# Altium PCB PCB2.PcbDoc (part 2 of 3)
Units mm, origin at the board's own origin, x right, y up, seen from the top; angles counter-clockwise.
Board outline 30 x 45 mm, 4 copper layers (L1 (SIG), L2 (GND), L3 (GND), L4 (SIG+PWR)), stack 0.602 mm thick; 68 components, 50 nets, 259 pads, 113 vias.
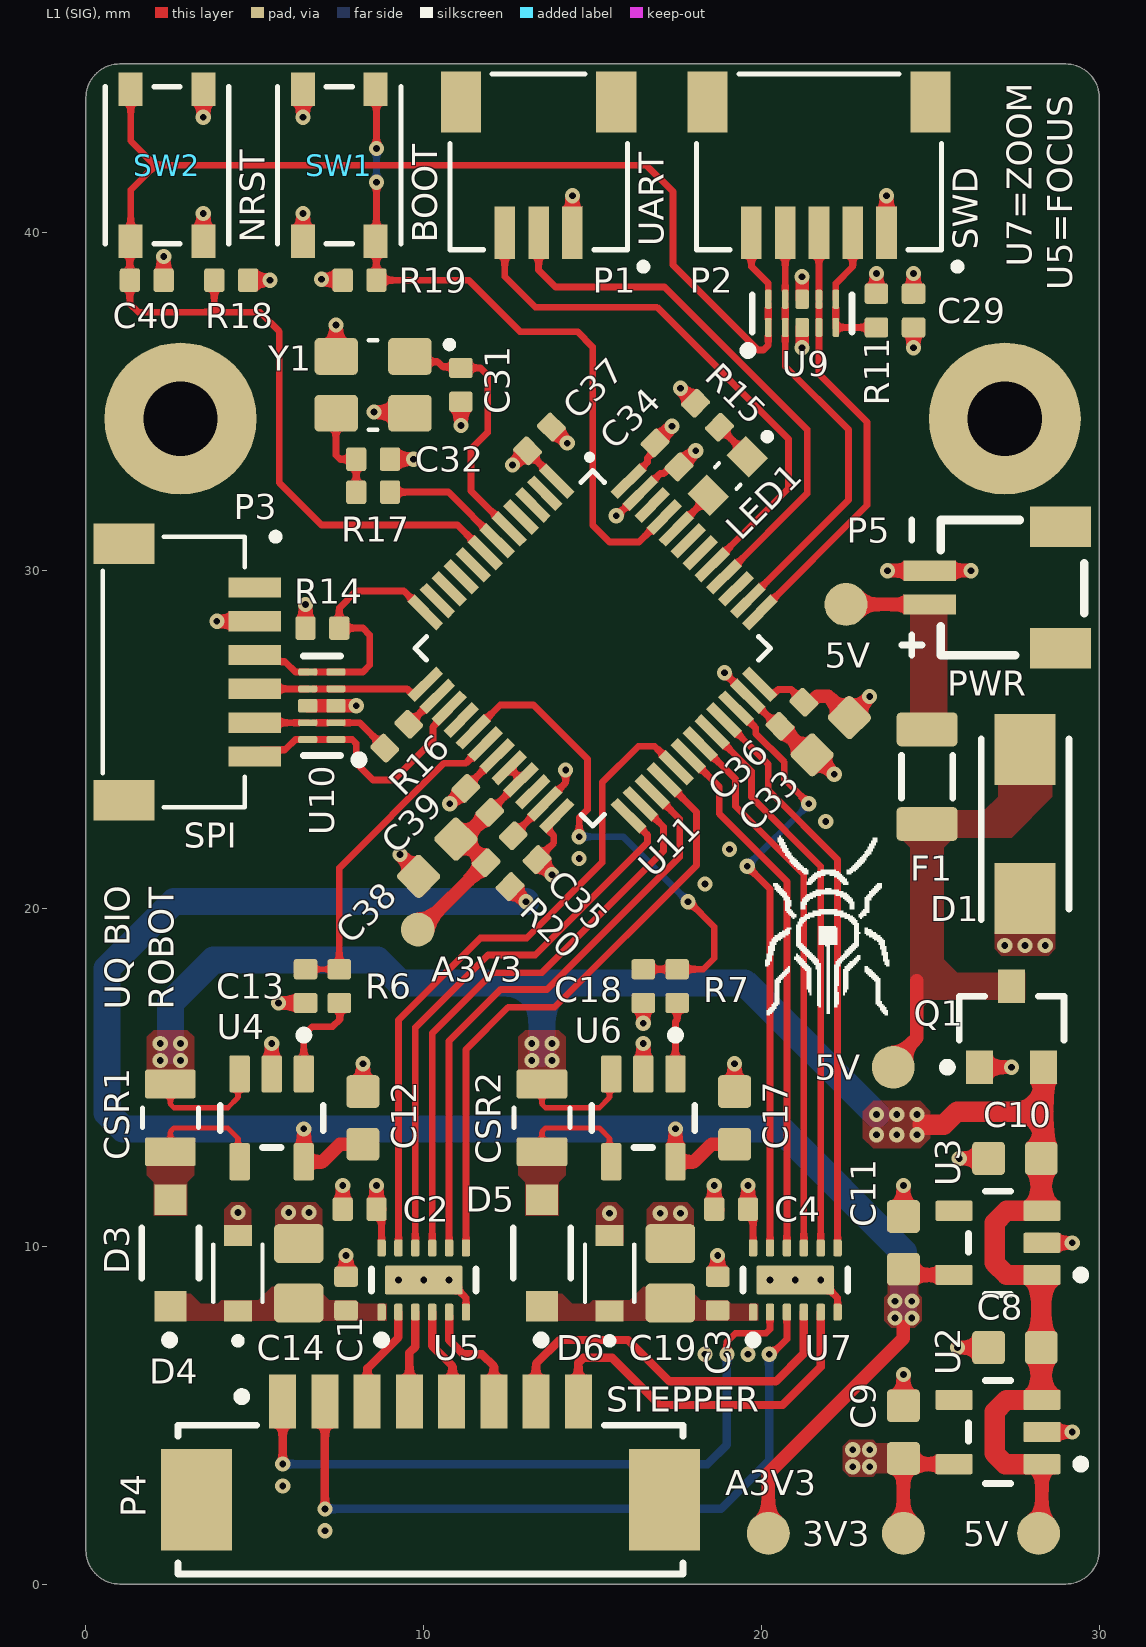
[diagram p0: L1 (SIG) view]

## Part data (continued)
D3 D5: "1N5819HW Series 40 V 1 A Surface Mount Schottky Barrier Rectifier - SOD-123", Average Rectified Current=1A, Capacitance=50pF, Case/Package=SOD-123-2, Forward Voltage=750mV, Manufacturer="Diodes Inc.", Max Forward Surge Current (Ifsm)=25A, Max Junction Temperature (Tj)=125°C, Max Power Dissipation=450mW, Max Repetitive Reverse Voltage (Vrrm)=40V, Min Operating Temperature=-65°C, Peak Reverse Current=1mA, Supplier Part Number 1=1N5819HW-FDICT-ND, Category="Schottky Diodes", China RoHS=Compliant, ComponentLink1Description=https://datasheet.octopart.com:443/1N5819HW-7-F-Diodes-Inc.-datasheet-180549196.pdf?src-supplier=IHS, ComponentLink1URL=https://datasheet.octopart.com:443/1N5819HW-7-F-Diodes-Inc.-datasheet-180549196.pdf?src-supplier=IHS, ComponentLink2Description=https://datasheet.octopart.com:443/1N5819HW-7-F-Diodes-Inc.-datasheet-8332965.pdf?src-supplier=Upverter, ComponentLink2URL=https://datasheet.octopart.com:443/1N5819HW-7-F-Diodes-Inc.-datasheet-8332965.pdf?src-supplier=Upverter, ComponentLink3Description=https://sigma.octopart.com:443/138895985/technical_drawing/Diodes-Inc.-1N5819HW-7-F.pdf?src-supplier=Upverter, ComponentLink3URL=https://sigma.octopart.com:443/138895985/technical_drawing/Diodes-Inc.-1N5819HW-7-F.pdf?src-supplier=Upverter, ComponentLink4Description=https://datasheet.octopart.com:443/1N5819HW-7-F-Diodes-Inc.-datasheet-134530231.pdf?src-supplier=Future+Electronics, ComponentLink4URL=https://datasheet.octopart.com:443/1N5819HW-7-F-Diodes-Inc.-datasheet-134530231.pdf?src-supplier=Future+Electronics, ComponentLink5Description=https://datasheet.octopart.com:443/1N5819HW-7-F-Diodes-Inc.-datasheet-34441420.pdf?src-supplier=Future+Electronics, ComponentLink5URL=https://datasheet.octopart.com:443/1N5819HW-7-F-Diodes-Inc.-datasheet-34441420.pdf?src-supplier=Future+Electronics, ComponentLink6Description=https://datasheet.octopart.com:443/1N5819HW-7-F-Diodes-Inc.-datasheet-10497210.pdf?src-supplier=Future+Electronics, ComponentLink6URL=https://datasheet.octopart.com:443/1N5819HW-7-F-Diodes-Inc.-datasheet-10497210.pdf?src-supplier=Future+Electronics, ComponentLink7Description=https://datasheet.octopart.com:443/1N5819HW-7-F-Diodes-Inc.-datasheet-169364014.pdf?src-supplier=Newark, ComponentLink7URL=https://datasheet.octopart.com:443/1N5819HW-7-F-Diodes-Inc.-datasheet-169364014.pdf?src-supplier=Newark, ComponentLink8Description=https://datasheet.octopart.com:443/1N5819HW-7-F-Diodes-Inc.-datasheet-78715396.pdf?src-supplier=Newark, ComponentLink8URL=https://datasheet.octopart.com:443/1N5819HW-7-F-Diodes-Inc.-datasheet-78715396.pdf?src-supplier=Newark, ComponentLink9Description=https://datasheet.octopart.com:443/1N5819HW-7-F-Diodes-Inc.-datasheet-14053419.pdf?src-supplier=iiiC, ComponentLink9URL=https://datasheet.octopart.com:443/1N5819HW-7-F-Diodes-Inc.-datasheet-14053419.pdf?src-supplier=iiiC, ComponentLink10Description=https://datasheet.octopart.com:443/1N5819HW-7-F-Diodes-Inc.-datasheet-7274306.pdf?src-supplier=Jameco+(USA), ComponentLink10URL=https://datasheet.octopart.com:443/1N5819HW-7-F-Diodes-Inc.-datasheet-7274306.pdf?src-supplier=Jameco+(USA), ComponentLink11Description=https://datasheet.octopart.com:443/1N5819HW-7-F-Diodes-Inc.-datasheet-16627.pdf?src-supplier=Mouser, ComponentLink11URL=https://datasheet.octopart.com:443/1N5819HW-7-F-Diodes-Inc.-datasheet-16627.pdf?src-supplier=Mouser, ComponentLink12Description=https://datasheet.octopart.com:443/1N5819HW-7-F-Diodes-Inc.-datasheet-145195.pdf?src-supplier=DigiKey, ComponentLink12URL=https://datasheet.octopart.com:443/1N5819HW-7-F-Diodes-Inc.-datasheet-145195.pdf?src-supplier=DigiKey, ComponentLink13Description=http://sigma.octopart.com:80/15616867/materials_sheet/Diodes-Inc.-1N5819HW-7-F.pdf?src-supplier=Compliance+Statements, ComponentLink13URL=http://sigma.octopart.com:80/15616867/materials_sheet/Diodes-Inc.-1N5819HW-7-F.pdf?src-supplier=Compliance+Statements, Contact Plating=Tin, Current Rating=1A, Element Configuration=Single, Forward Current=1A, Height=1.45mm, Lead Free="Lead Free", Length=2.85mm, Lifecycle Status=Production, Manufacturer Part Number=1N5819HW-7-F, Max Operating Temperature=125°C, Max Output Current=1A, Max Reverse Voltage (DC)=40V, Min Breakdown Voltage=40V, Number of Elements=1, Number of Pins=2, Number of Terminals=2, Output Current=1A, Packaging="Tape and Reel", Peak Non-Repetitive Surge Current=25A, Polarity=Standard, Pricing 1="1=0.29, 10=0.178, 100=0.1108, 500=0.08152, 1000=0.07202 (USD)", Radiation Hardening=No, REACH SVHC=Yes, Reverse Standoff Voltage=40V, Reverse Voltage=40V, RoHS=Compliant, Schedule B="8541100080, 8541100080|8541100080|8541100080|8541100080|8541100080", Stock 1=1016143, Supplier 1=DigiKey, Termination=SMD/SMT, Voltage Rating (DC)=40V, Weight=10.007382mg, Width=1.7mm
D4 D6: "Trans Voltage Suppressor Diode, 350W, 5V V(RWM), Unidirectional, 1 Element, Silicon", Clamping Voltage=14.5V, Manufacturer="Sangdest Microelectronics", Max Operating Temperature=125°C, Min Breakdown Voltage=6V, Min Operating Temperature=-55°C, Peak Pulse Power=350W, Peak Reverse Current=10µA, Reverse Standoff Voltage=5V, Supplier Part Number 1=1655-SD05CT-ND, Category="TVS Diodes", ComponentLink1Description=https://datasheet.octopart.com:443/SD05-SMC-Diode-Solutions-datasheet-181400473.pdf?src-supplier=IHS, ComponentLink1URL=https://datasheet.octopart.com:443/SD05-SMC-Diode-Solutions-datasheet-181400473.pdf?src-supplier=IHS, Lifecycle Status=Production, Manufacturer Part Number=SD05, Number of Elements=1, Number of Terminals=2, Polarity=Unidirectional, Pricing 1="1=0.27, 10=0.165, 100=0.1025, 500=0.0752, 1000=0.06636 (USD)", REACH SVHC=Yes, RoHS=Compliant, Stock 1=13210, Supplier 1=DigiKey
F1: library part 1206L075THYR, "PTC Resettable Fuse 0.75A(hold) 1.5A(trip) 8VDC 100A 0.6W 0.2s 0.09Ohm SMD Solder Pad 1206 T/R", Case Code (Imperial)=1206, Case Code (Metric)=3216, Current Rating=100A, Hold Current=750mA, Manufacturer=Littelfuse, Max Operating Temperature=85°C, Max Supply Voltage (DC)=8V, Maximum Resistance 1 Hour (R1max)=290mΩ, Min Operating Temperature=-40°C, Minimum Resistance Initial (Rmin)=90mΩ, Power Dissipation=600mW, Ratings=TUV, Supplier Part Number 1=F3370CT-ND, Trip Current=1.5A, Approvals="TUV, cULus", Case/Package=1206, Category="PTC Resettable Fuses", China RoHS=Compliant, ComponentLink1Description=https://datasheet.octopart.com:443/1206L075THYR-Littelfuse-datasheet-181956355.pdf?src-supplier=Farnell, ComponentLink1URL=https://datasheet.octopart.com:443/1206L075THYR-Littelfuse-datasheet-181956355.pdf?src-supplier=Farnell, ComponentLink2Description=https://datasheet.octopart.com:443/1206L075THYR-Littelfuse-datasheet-8722135.pdf?src-supplier=Farnell, ComponentLink2URL=https://datasheet.octopart.com:443/1206L075THYR-Littelfuse-datasheet-8722135.pdf?src-supplier=Farnell, ComponentLink3Description=https://datasheet.octopart.com:443/1206L075THYR-Littelfuse-datasheet-12510028.pdf?src-supplier=Farnell, ComponentLink3URL=https://datasheet.octopart.com:443/1206L075THYR-Littelfuse-datasheet-12510028.pdf?src-supplier=Farnell, ComponentLink4Description=https://datasheet.octopart.com:443/1206L075THYR-Littelfuse-datasheet-10365336.pdf?src-supplier=Farnell, ComponentLink4URL=https://datasheet.octopart.com:443/1206L075THYR-Littelfuse-datasheet-10365336.pdf?src-supplier=Farnell, ComponentLink5Description=https://datasheet.octopart.com:443/1206L075THYR-Littelfuse-datasheet-8701791.pdf?src-supplier=Farnell, ComponentLink5URL=https://datasheet.octopart.com:443/1206L075THYR-Littelfuse-datasheet-8701791.pdf?src-supplier=Farnell, ComponentLink6Description=https://datasheet.octopart.com:443/1206L075THYR-Littelfuse-datasheet-8325659.pdf?src-supplier=Farnell, ComponentLink6URL=https://datasheet.octopart.com:443/1206L075THYR-Littelfuse-datasheet-8325659.pdf?src-supplier=Farnell, ComponentLink7Description=https://datasheet.octopart.com:443/1206L075THYR-Littelfuse-datasheet-8821216.pdf?src-supplier=element14+APAC, ComponentLink7URL=https://datasheet.octopart.com:443/1206L075THYR-Littelfuse-datasheet-8821216.pdf?src-supplier=element14+APAC, ComponentLink8Description=https://datasheet.octopart.com:443/1206L075THYR-Littelfuse-datasheet-165518606.pdf?src-supplier=Newark, ComponentLink8URL=https://datasheet.octopart.com:443/1206L075THYR-Littelfuse-datasheet-165518606.pdf?src-supplier=Newark, ComponentLink9Description=https://datasheet.octopart.com:443/1206L075THYR-Littelfuse-datasheet-8814422.pdf?src-supplier=Newark, ComponentLink9URL=https://datasheet.octopart.com:443/1206L075THYR-Littelfuse-datasheet-8814422.pdf?src-supplier=Newark, ComponentLink10Description=https://datasheet.octopart.com:443/1206L075THYR-Littelfuse-datasheet-130008768.pdf?src-supplier=ODG+(Origin+Data+Global), ComponentLink10URL=https://datasheet.octopart.com:443/1206L075THYR-Littelfuse-datasheet-130008768.pdf?src-supplier=ODG+(Origin+Data+Global), ComponentLink11Description=https://datasheet.octopart.com:443/1206L075THYR-Littelfuse-datasheet-26530142.pdf?src-supplier=Fuses+Unlimited, ComponentLink11URL=https://datasheet.octopart.com:443/1206L075THYR-Littelfuse-datasheet-26530142.pdf?src-supplier=Fuses+Unlimited, ComponentLink12Description=https://datasheet.octopart.com:443/1206L075THYR-Littelfuse-datasheet-183575726.pdf?src-supplier=Sager+Electronics, ComponentLink12URL=https://datasheet.octopart.com:443/1206L075THYR-Littelfuse-datasheet-183575726.pdf?src-supplier=Sager+Electronics, ComponentLink13Description=https://datasheet.octopart.com:443/1206L075THYR-Littelfuse-datasheet-176144932.pdf?src-supplier=Sager+Electronics, ComponentLink13URL=https://datasheet.octopart.com:443/1206L075THYR-Littelfuse-datasheet-176144932.pdf?src-supplier=Sager+Electronics, ComponentLink14Description=https://datasheet.octopart.com:443/1206L075THYR-Littelfuse-datasheet-170674161.pdf?src-supplier=Future+Electronics, ComponentLink14URL=https://datasheet.octopart.com:443/1206L075THYR-Littelfuse-datasheet-170674161.pdf?src-supplier=Future+Electronics, ComponentLink15Description=https://datasheet.octopart.com:443/1206L075THYR-Littelfuse-datasheet-20852186.pdf?src-supplier=Future+Electronics, ComponentLink15URL=https://datasheet.octopart.com:443/1206L075THYR-Littelfuse-datasheet-20852186.pdf?src-supplier=Future+Electronics, ComponentLink16Description=https://datasheet.octopart.com:443/1206L075THYR-Littelfuse-datasheet-177174148.pdf?src-supplier=Burklin+Elektronik, ComponentLink16URL=https://datasheet.octopart.com:443/1206L075THYR-Littelfuse-datasheet-177174148.pdf?src-supplier=Burklin+Elektronik, Export Control Classification Number (ECCN) Code=EAR99, Harmonized Tariff Schedule (HTS) Code=8533.40.80.70, Height=750µm, Introduction Date=2009-08-04, Lead Free="Lead Free", Length=3.4mm, Lifecycle Status=Production, Manufacturer Part Number=1206L075THYR, Max Current Rating=100A, Max Voltage Rating (DC)=8V, Mount="Surface Mount", Number of Terminals=2, Operating Supply Voltage=8V, Packaging="Cut Tape", Pricing 1="1=0.64, 5=0.528, 10=0.488, 50=0.4048, 100=0.3734, 250=0.33572, 500=0.30966, 1000=0.28553 (USD)", REACH SVHC=Yes, Resistance=90mΩ, RoHS=Compliant, Stock 1=23337, Supplier 1=DigiKey, Termination=SMD/SMT, Time to Trip=200ms, Voltage Rating (DC)=8V, Width=1.8mm, Working Voltage=8V
LED1: library part LTST-C190KGKT, "LED yellow green 0603 wavelength 567.5nm~576.5nm light intensity 18mcd~71mcd Front Mounting", Case Code (Imperial)=0603, Case Code (Metric)=1608, Color=Green, Forward Current=30mA, Forward Voltage=2.15V, Lens Color="Clear, Colorless", Manufacturer="Diodes Inc.", Max Operating Temperature=85°C, Min Operating Temperature=-30°C, Power Dissipation=75mW, Reverse Voltage=5V, Test Current=20mA, Case/Package=0603, Category=LEDs, China RoHS=Compliant, ComponentLink1Description=https://datasheet.octopart.com:443/LTST-C190KGKT-Lite-On-datasheet-86397316.pdf?src-supplier=ODG+(Origin+Data+Global), ComponentLink1URL=https://datasheet.octopart.com:443/LTST-C190KGKT-Lite-On-datasheet-86397316.pdf?src-supplier=ODG+(Origin+Data+Global), ComponentLink2Description=https://datasheet.octopart.com:443/LTST-C190KGKT-Lite-On-datasheet-180605179.pdf?src-supplier=IHS, ComponentLink2URL=https://datasheet.octopart.com:443/LTST-C190KGKT-Lite-On-datasheet-180605179.pdf?src-supplier=IHS, ComponentLink3Description=https://datasheet.octopart.com:443/LTST-C190KGKT-Lite-On-datasheet-13693967.pdf?src-supplier=Factory+Futures, ComponentLink3URL=https://datasheet.octopart.com:443/LTST-C190KGKT-Lite-On-datasheet-13693967.pdf?src-supplier=Factory+Futures, ComponentLink4Description=https://datasheet.octopart.com:443/LTST-C190KGKT-Lite-On-datasheet-165573809.pdf?src-supplier=TME, ComponentLink4URL=https://datasheet.octopart.com:443/LTST-C190KGKT-Lite-On-datasheet-165573809.pdf?src-supplier=TME, ComponentLink5Description=https://datasheet.octopart.com:443/LTST-C190KGKT-Lite-On-datasheet-165573808.pdf?src-supplier=TME, ComponentLink5URL=https://datasheet.octopart.com:443/LTST-C190KGKT-Lite-On-datasheet-165573808.pdf?src-supplier=TME, ComponentLink6Description=https://datasheet.octopart.com:443/LTST-C190KGKT-Lite-On-datasheet-43775815.pdf?src-supplier=TME, ComponentLink6URL=https://datasheet.octopart.com:443/LTST-C190KGKT-Lite-On-datasheet-43775815.pdf?src-supplier=TME, ComponentLink7Description=https://datasheet.octopart.com:443/LTST-C190KGKT-Lite-On-datasheet-32046999.pdf?src-supplier=Future+Electronics, ComponentLink7URL=https://datasheet.octopart.com:443/LTST-C190KGKT-Lite-On-datasheet-32046999.pdf?src-supplier=Future+Electronics, ComponentLink8Description=https://datasheet.octopart.com:443/LTST-C190KGKT-Lite-On-datasheet-8326678.pdf?src-supplier=Future+Electronics, ComponentLink8URL=https://datasheet.octopart.com:443/LTST-C190KGKT-Lite-On-datasheet-8326678.pdf?src-supplier=Future+Electronics, ComponentLink9Description=https://datasheet.octopart.com:443/LTST-C190KGKT-Lite-On-datasheet-78838574.pdf?src-supplier=Future+Electronics, ComponentLink9URL=https://datasheet.octopart.com:443/LTST-C190KGKT-Lite-On-datasheet-78838574.pdf?src-supplier=Future+Electronics, ComponentLink10Description=https://datasheet.octopart.com:443/LTST-C190KGKT-Lite-On-datasheet-158288.pdf?src-supplier=Mouser, ComponentLink10URL=https://datasheet.octopart.com:443/LTST-C190KGKT-Lite-On-datasheet-158288.pdf?src-supplier=Mouser, ComponentLink11Description=https://datasheet.octopart.com:443/LTST-C190KGKT-Lite-On-datasheet-49281.pdf?src-supplier=DigiKey, ComponentLink11URL=https://datasheet.octopart.com:443/LTST-C190KGKT-Lite-On-datasheet-49281.pdf?src-supplier=DigiKey, ComponentLink12Description=https://datasheet.octopart.com:443/LTST-C190KGKT-Lite-On-datasheet-14174998.pdf?src-supplier=iiiC, ComponentLink12URL=https://datasheet.octopart.com:443/LTST-C190KGKT-Lite-On-datasheet-14174998.pdf?src-supplier=iiiC, Depth=800µm, Dominant Wavelength=571nm, Height=800µm, Illumination Color=Green, Lead Free="Lead Free", Length=1.6mm, Lens Style=Clear, Lens Transparency=Clear, Lifecycle Status=Production, Luminous Intensity=35mcd, Manufacturer Part Number=LTST-C190KGKT, Mount="Surface Mount", Number of Circuits=1, Number of Elements=1, Number of LEDs=1, Number of Pins=2, Number of Terminals=2, Peak Wavelength=574nm, Power Rating=75mW, Pricing 1="1=0.13, 10=0.088, 100=0.0603, 500=0.04758, 1000=0.04332, 2000=0.03968 (USD)", Radiation Hardening=No, REACH SVHC=Yes, RoHS=Compliant, Schedule B="8541402000, 8541402000|8541402000|8541402000|8541402000|8541402000|8541402000|8541402000|8541402000|8541402000|8541402000|8541402000|8541402000|8541402000|8541402000|8541402000|8541402000|8541402000|8541402000|8541402000|8541402000|8541402000|8541402000|8541402000|85", Shape=Rectangular, Stock 1=2033232, Supplier 1=DigiKey, Terminal Pitch=1.5mm, Viewing Angle=130°, Wavelength=574nm, Width=800µm
P1: library part SM03B-SRSS-TB_UART, "Board Connector, 3 Contact(s), 1 Row(s), Male, Right Angle, Surface Mount Terminal", Color=Natural, Manufacturer=JST, Max Operating Temperature=85°C, Min Operating Temperature=-25°C, Category="Card Edge Connectors", ComponentLink1Description=https://datasheet.octopart.com:443/SM03B-SRSS-TB-JST-datasheet-180492086.pdf?src-supplier=IHS, ComponentLink1URL=https://datasheet.octopart.com:443/SM03B-SRSS-TB-JST-datasheet-180492086.pdf?src-supplier=IHS, ComponentLink2Description=https://datasheet.octopart.com:443/SM03B-SRSS-TB-JST-datasheet-44103209.pdf?src-supplier=TME, ComponentLink2URL=https://datasheet.octopart.com:443/SM03B-SRSS-TB-JST-datasheet-44103209.pdf?src-supplier=TME, ComponentLink3Description=https://datasheet.octopart.com:443/SM03B-SRSS-TB-JST-datasheet-118603.pdf?src-supplier=DigiKey, ComponentLink3URL=https://datasheet.octopart.com:443/SM03B-SRSS-TB-JST-datasheet-118603.pdf?src-supplier=DigiKey, ComponentLink4Description=https://datasheet.octopart.com:443/SM03B-SRSS-TB-JST-datasheet-152738602.pdf?src-supplier=Amar+Radio+Corporation, ComponentLink4URL=https://datasheet.octopart.com:443/SM03B-SRSS-TB-JST-datasheet-152738602.pdf?src-supplier=Amar+Radio+Corporation, Connector Type="Male Pin", Contact Gender=Male, Contact Plating=Tin, Housing Color=Natural, Housing Material=Nylon, Lead Free="Contains Lead", Lifecycle Status=Obsolete, Manufacturer Part Number=SM03B-SRSS-TB, Mount="Surface Mount", Number of Contacts=3, Number of Pins=3, Number of Positions=3, Number of Rows=1, Orientation=Horizontal, Pitch=990.6µm, Pricing 1="1=0.44, 10=0.373, 100=0.317, 500=0.2829, 1000=0.26938 (USD)", RoHS=Compliant, Stock 1=14167, Supplier 1=DigiKey, Terminal Pitch=1mm, Termination=Solder
P2: library part SM05B-SRSS-TB-SWD, "Board Connector, 5 Contact(s), 1 Row(s), Male, Right Angle, Surface Mount Terminal", Color=Natural, Manufacturer=JST, Category="Card Edge Connectors", ComponentLink1Description=https://datasheet.octopart.com:443/SM05B-SRSS-TB-JST-datasheet-180492086.pdf?src-supplier=IHS, ComponentLink1URL=https://datasheet.octopart.com:443/SM05B-SRSS-TB-JST-datasheet-180492086.pdf?src-supplier=IHS, ComponentLink2Description=https://datasheet.octopart.com:443/SM05B-SRSS-TB-JST-datasheet-118603.pdf?src-supplier=DigiKey, ComponentLink2URL=https://datasheet.octopart.com:443/SM05B-SRSS-TB-JST-datasheet-118603.pdf?src-supplier=DigiKey, ComponentLink3Description=https://datasheet.octopart.com:443/SM05B-SRSS-TB-JST-datasheet-152738602.pdf?src-supplier=Amar+Radio+Corporation, ComponentLink3URL=https://datasheet.octopart.com:443/SM05B-SRSS-TB-JST-datasheet-152738602.pdf?src-supplier=Amar+Radio+Corporation, Connector Type="Male Pin", Contact Plating=Tin, Export Control Classification Number (ECCN) Code=EAR99, Gender=Male, Harmonized Tariff Schedule (HTS) Code=8536.69.40.40, Housing Color=Natural, Housing Material=Nylon, Introduction Date=1996-04-01, Lead Free="Contains Lead", Lifecycle Status=Obsolete, Manufacturer Part Number=SM05B-SRSS-TB, Mount="Surface Mount", Number of Contacts=5, Number of Positions=5, Number of Rows=1, Orientation="Right Angle", Pitch=990.6µm, Pricing 1="1=0.62, 10=0.527, 100=0.4477, 500=0.3996, 1000=0.38051 (USD)", RoHS=Compliant, Stock 1=42194, Supplier 1=DigiKey, Terminal Pitch=1mm, Termination=Solder
P3: library part SM06B-SRSS-TB_SPI, "Board Connector, 6 Contact(s), 1 Row(s), Male, Right Angle, 0.039 inch Pitch, Surface Mount Terminal", Color=Natural, Dielectric Material=Polyamide, Manufacturer=JST, Max Operating Temperature=85°C, Min Operating Temperature=-25°C, Category="Card Edge Connectors", ComponentLink1Description=https://datasheet.octopart.com:443/SM06B-SRSS-TB-JST-datasheet-118603.pdf?src-supplier=Upverter, ComponentLink1URL=https://datasheet.octopart.com:443/SM06B-SRSS-TB-JST-datasheet-118603.pdf?src-supplier=Upverter, ComponentLink2Description=https://datasheet.octopart.com:443/SM06B-SRSS-TB-JST-datasheet-180492086.pdf?src-supplier=IHS, ComponentLink2URL=https://datasheet.octopart.com:443/SM06B-SRSS-TB-JST-datasheet-180492086.pdf?src-supplier=IHS, ComponentLink3Description=https://datasheet.octopart.com:443/SM06B-SRSS-TB-JST-datasheet-44103209.pdf?src-supplier=TME, ComponentLink3URL=https://datasheet.octopart.com:443/SM06B-SRSS-TB-JST-datasheet-44103209.pdf?src-supplier=TME, ComponentLink4Description=https://datasheet.octopart.com:443/SM06B-SRSS-TB-JST-datasheet-152738602.pdf?src-supplier=Amar+Radio+Corporation, ComponentLink4URL=https://datasheet.octopart.com:443/SM06B-SRSS-TB-JST-datasheet-152738602.pdf?src-supplier=Amar+Radio+Corporation, Connector Type="Male Pin", Contact Gender=Male, Contact Plating=Tin, Housing Color=Natural, Housing Material=Nylon, Lead Free="Contains Lead", Lifecycle Status=Obsolete, Manufacturer Package Identifier=SM06B-SRSS-TB, Manufacturer Part Number=SM06B-SRSS-TB, Mount="Surface Mount", Number of Contacts=6, Number of Pins=6, Number of Positions=6, Number of Rows=1, Orientation=Horizontal, Pitch=990.6µm, Pricing 1="1=0.67, 10=0.567, 100=0.4821, 500=0.43024, 1000=0.40969 (USD)", RoHS=Compliant, Stock 1=26532, Supplier 1=DigiKey, Terminal Pitch=1mm, Termination=Solder
P4: "1.25mm (.049\") Pitch PicoBlade Header, Surface Mount, Right Angle, Lead-free, 8 Circuits", Ambient Temperature Range High=105°C, Color=Beige, Contact Resistance=20mΩ, Current Rating=1A, Flammability Rating="UL94 V-0", Insulation Resistance=100MΩ, Manufacturer=Molex, Manufacturer Lifecycle Status=ACTIVE, Min Operating Temperature=-40°C, Ratings=CSA, Supplier Part Number 1=WM7626CT-ND, Voltage Rating=125V, Category="Headers and Wire Housings", China RoHS=Compliant, ComponentLink1Description=https://datasheet.octopart.com:443/53261-0871-Molex-datasheet-177725531.pdf?src-supplier=Farnell, ComponentLink1URL=https://datasheet.octopart.com:443/53261-0871-Molex-datasheet-177725531.pdf?src-supplier=Farnell, ComponentLink2Description=https://datasheet.octopart.com:443/53261-0871-Molex-datasheet-11023919.pdf?src-supplier=Farnell, ComponentLink2URL=https://datasheet.octopart.com:443/53261-0871-Molex-datasheet-11023919.pdf?src-supplier=Farnell, ComponentLink3Description=https://datasheet.octopart.com:443/53261-0871-Molex-datasheet-101583405.pdf?src-supplier=Farnell, ComponentLink3URL=https://datasheet.octopart.com:443/53261-0871-Molex-datasheet-101583405.pdf?src-supplier=Farnell, ComponentLink4Description=https://datasheet.octopart.com:443/532610871-Molex-datasheet-520094.pdf?src-supplier=Farnell, ComponentLink4URL=https://datasheet.octopart.com:443/532610871-Molex-datasheet-520094.pdf?src-supplier=Farnell, ComponentLink5Description=https://sigma.octopart.com:443/140425834/technical_drawing/Molex-53261-0871.pdf?src-supplier=Upverter, ComponentLink5URL=https://sigma.octopart.com:443/140425834/technical_drawing/Molex-53261-0871.pdf?src-supplier=Upverter, ComponentLink6Description=https://datasheet.octopart.com:443/53261-0871-Molex-datasheet-140462602.pdf?src-supplier=Upverter, ComponentLink6URL=https://datasheet.octopart.com:443/53261-0871-Molex-datasheet-140462602.pdf?src-supplier=Upverter, ComponentLink7Description=https://datasheet.octopart.com:443/53261-0871-Molex-datasheet-12537161.pdf?src-supplier=_legacy+Avnet, ComponentLink7URL=https://datasheet.octopart.com:443/53261-0871-Molex-datasheet-12537161.pdf?src-supplier=_legacy+Avnet, ComponentLink8Description=https://datasheet.octopart.com:443/532610871-Molex-datasheet-8343080.pdf?src-supplier=TME, ComponentLink8URL=https://datasheet.octopart.com:443/532610871-Molex-datasheet-8343080.pdf?src-supplier=TME, ComponentLink9Description=https://datasheet.octopart.com:443/53261-0871-Molex-datasheet-10404416.pdf?src-supplier=Molex, ComponentLink9URL=https://datasheet.octopart.com:443/53261-0871-Molex-datasheet-10404416.pdf?src-supplier=Molex, ComponentLink10Description=https://sigma.octopart.com:443/16413766/technical_drawing/Molex-53261-0871.pdf?src-supplier=Molex, ComponentLink10URL=https://sigma.octopart.com:443/16413766/technical_drawing/Molex-53261-0871.pdf?src-supplier=Molex, ComponentLink11Description=https://datasheet.octopart.com:443/53261-0871-Molex-datasheet-154756037.pdf?src-supplier=Master+Electronics, ComponentLink11URL=https://datasheet.octopart.com:443/53261-0871-Molex-datasheet-154756037.pdf?src-supplier=Master+Electronics, ComponentLink12Description=https://datasheet.octopart.com:443/53261-0871-Molex-datasheet-21208676.pdf?src-supplier=Electro+Sonic, ComponentLink12URL=https://datasheet.octopart.com:443/53261-0871-Molex-datasheet-21208676.pdf?src-supplier=Electro+Sonic, ComponentLink13Description=https://datasheet.octopart.com:443/53261-0871-Molex-datasheet-62105452.pdf?src-supplier=Electro+Sonic, ComponentLink13URL=https://datasheet.octopart.com:443/53261-0871-Molex-datasheet-62105452.pdf?src-supplier=Electro+Sonic, ComponentLink14Description=https://datasheet.octopart.com:443/53261-0871-Molex-datasheet-8522546.pdf?src-supplier=element14, ComponentLink14URL=https://datasheet.octopart.com:443/53261-0871-Molex-datasheet-8522546.pdf?src-supplier=element14, ComponentLink15Description=https://datasheet.octopart.com:443/53261-0871-Molex-datasheet-100429.pdf?src-supplier=element14, ComponentLink15URL=https://datasheet.octopart.com:443/53261-0871-Molex-datasheet-100429.pdf?src-supplier=element14, ComponentLink16Description=https://datasheet.octopart.com:443/0532610871-Molex-datasheet-157440116.pdf?src-supplier=Sager+Electronics, ComponentLink16URL=https://datasheet.octopart.com:443/0532610871-Molex-datasheet-157440116.pdf?src-supplier=Sager+Electronics, ComponentLink17Description=https://datasheet.octopart.com:443/53261-0871-Molex-datasheet-140186590.pdf?src-supplier=RS+(Formerly+Allied+Electronics), ComponentLink17URL=https://datasheet.octopart.com:443/53261-0871-Molex-datasheet-140186590.pdf?src-supplier=RS+(Formerly+Allied+Electronics), ComponentLink18Description=https://datasheet.octopart.com:443/53261-0871-Molex-datasheet-120153903.pdf?src-supplier=RS+(Formerly+Allied+Electronics), ComponentLink18URL=https://datasheet.octopart.com:443/53261-0871-Molex-datasheet-120153903.pdf?src-supplier=RS+(Formerly+Allied+Electronics), ComponentLink19Description=https://datasheet.octopart.com:443/53261-0871-Molex-datasheet-34442330.pdf?src-supplier=RS+(Formerly+Allied+Electronics), ComponentLink19URL=https://datasheet.octopart.com:443/53261-0871-Molex-datasheet-34442330.pdf?src-supplier=RS+(Formerly+Allied+Electronics), ComponentLink20Description=https://datasheet.octopart.com:443/532610871-Molex-datasheet-137316104.pdf?src-supplier=Future+Electronics, ComponentLink20URL=https://datasheet.octopart.com:443/532610871-Molex-datasheet-137316104.pdf?src-supplier=Future+Electronics, ComponentLink21Description=https://datasheet.octopart.com:443/53261-0871-Molex-datasheet-33003884.pdf?src-supplier=Newark, ComponentLink21URL=https://datasheet.octopart.com:443/53261-0871-Molex-datasheet-33003884.pdf?src-supplier=Newark, ComponentLink22Description=https://datasheet.octopart.com:443/53261-0871-Molex-datasheet-33003883.pdf?src-supplier=Newark, ComponentLink22URL=https://datasheet.octopart.com:443/53261-0871-Molex-datasheet-33003883.pdf?src-supplier=Newark, ComponentLink23Description=https://datasheet.octopart.com:443/0532610871-Molex-datasheet-11889475.pdf?src-supplier=Arrow+Electronics, ComponentLink23URL=https://datasheet.octopart.com:443/0532610871-Molex-datasheet-11889475.pdf?src-supplier=Arrow+Electronics, ComponentLink24Description=https://datasheet.octopart.com:443/53261-0871-Molex-datasheet-17741852.pdf?src-supplier=Jameco+(USA), ComponentLink24URL=https://datasheet.octopart.com:443/53261-0871-Molex-datasheet-17741852.pdf?src-supplier=Jameco+(USA), ComponentLink25Description=https://datasheet.octopart.com:443/53261-0871-Molex-datasheet-145971.pdf?src-supplier=DigiKey, ComponentLink25URL=https://datasheet.octopart.com:443/53261-0871-Molex-datasheet-145971.pdf?src-supplier=DigiKey, ComponentLink26Description=http://sigma.octopart.com:80/16413779/rohs_statement/Molex-53261-0871.pdf?src-supplier=Compliance+Statements, ComponentLink26URL=http://sigma.octopart.com:80/16413779/rohs_statement/Molex-53261-0871.pdf?src-supplier=Compliance+Statements, ComponentLink27Description=http://sigma.octopart.com:80/reach_statement/Molex-company-74.pdf?src-supplier=Compliance+Statements, ComponentLink27URL=http://sigma.octopart.com:80/reach_statement/Molex-company-74.pdf?src-supplier=Compliance+Statements, ComponentLink28Description=http://sigma.octopart.com:80/rohs_statement/Molex-company-73.pdf?src-supplier=Compliance+Statements, ComponentLink28URL=http://sigma.octopart.com:80/rohs_statement/Molex-company-73.pdf?src-supplier=Compliance+Statements, ComponentLink29Description=http://sigma.octopart.com:80/conflict_mineral_statement/Molex-company-72.pdf?src-supplier=Compliance+Statements, ComponentLink29URL=http://sigma.octopart.com:80/conflict_mineral_statement/Molex-company-72.pdf?src-supplier=Compliance+Statements, Contact Material="Nickel, Tin", Contact Plating=Tin, Country of Origin=SG, Gender=Male, Glow Wire Compliant=Non-compliant, Height=3.6mm, Lead Free="Lead Free", Lead Pitch=1.25mm, Lifecycle Status=Production, Manufacturer Part Number=53261-0871, Max Operating Temperature=105°C, Mount="Surface Mount", Number of Circuits=7, Number of Contacts=8, Number of Pins=8, Number of Positions=8, Number of Rows=1, Orientation="Right Angle", Packaging="Cut Tape", Pitch=1.2446mm, Plating=Tin, Plating Thickness=990.6nm, Pricing 1="1=0.91, 10=0.772, 100=0.6556, 500=0.58518 (USD)", Radiation Hardening=No, REACH SVHC=Yes, RoHS=Compliant, Schedule B="8536694040, 8536694040|8536694040|8536694040|8536694040|8536694040|8536694040|8536694040|8536694040|8536694040|8536694040|8536694040|8536694040|8536694040|8536694040|8536694040|8536694040|8536694040|8536694040|8536694040|8536694040|8536694040|8536694040|8536694040|85", Stock 1=32917, Supplier 1=DigiKey, Terminal Pitch=1.25mm, Termination=Solder, Voltage Rating (AC)=125V, Voltage Rating (DC)=125V, Working Voltage=125V
P5: "Board Connector, 2 Contact(s), 1 Row(s), Male, Right Angle, Surface Mount Terminal", Color=Natural, Manufacturer=JST, Max Operating Temperature=85°C, Min Operating Temperature=-25°C, Supplier Part Number 1=455-SM02B-SRSS-TBCT-ND, Category="Card Edge Connectors", ComponentLink1Description=https://datasheet.octopart.com:443/SM02B-SRSS-TB-JST-datasheet-12513377.pdf?src-supplier=Upverter, ComponentLink1URL=https://datasheet.octopart.com:443/SM02B-SRSS-TB-JST-datasheet-12513377.pdf?src-supplier=Upverter, ComponentLink2Description=https://datasheet.octopart.com:443/SM02B-SRSS-TB-JST-datasheet-180492086.pdf?src-supplier=IHS, ComponentLink2URL=https://datasheet.octopart.com:443/SM02B-SRSS-TB-JST-datasheet-180492086.pdf?src-supplier=IHS, ComponentLink3Description=https://datasheet.octopart.com:443/SM02B-SRSS-TB-JST-datasheet-44103209.pdf?src-supplier=TME, ComponentLink3URL=https://datasheet.octopart.com:443/SM02B-SRSS-TB-JST-datasheet-44103209.pdf?src-supplier=TME, ComponentLink4Description=https://datasheet.octopart.com:443/SM02B-SRSS-TB-JST-datasheet-118603.pdf?src-supplier=DigiKey, ComponentLink4URL=https://datasheet.octopart.com:443/SM02B-SRSS-TB-JST-datasheet-118603.pdf?src-supplier=DigiKey, Connector Type="Male Pin", Contact Plating=Tin, Gender=Male, Housing Color=Natural, Housing Material=Nylon, Lead Free="Contains Lead", Lifecycle Status=Obsolete, Manufacturer Part Number=SM02B-SRSS-TB, Mount="Surface Mount", Number of Contacts=2, Number of Pins=2, Number of Positions=2, Number of Rows=1, Orientation="Right Angle", Pitch=1mm, Pricing 1="1=0.38, 10=0.325, 100=0.2759, 500=0.2462, 1000=0.23443 (USD)", RoHS=Compliant, Stock 1=48272, Supplier 1=DigiKey, Terminal Pitch=1mm, Termination=Solder
Q1: "Transistor: P-MOSFET; unipolar; -30V; 4, 2A; 1, 4W; 85 mOhm; ; -55+150 st.C; SMD; SOT23", Case/Package=TO-236-3, Continuous Drain Current (ID)=4A, Drain to Source Breakdown Voltage=-30V, Drain to Source Resistance=50mΩ, Gate to Source Voltage (Vgs)=12V, Input Capacitance=1.2nF, Manufacturer="Alpha & Omega Semiconductor", Max Junction Temperature (Tj)=150°C, Max Power Dissipation=1.4W, Min Breakdown Voltage=30V, Min Operating Temperature=-55°C, Supplier Part Number 1=785-1001-1-ND, Threshold Voltage=-900mV, Category=MOSFETs, ComponentLink1Description=https://datasheet.octopart.com:443/AO3401A-Alpha-%26-Omega-Semiconductor-datasheet-11631723.pdf?src-supplier=IHS, ComponentLink1URL=https://datasheet.octopart.com:443/AO3401A-Alpha-%26-Omega-Semiconductor-datasheet-11631723.pdf?src-supplier=IHS, ComponentLink2Description=https://sigma.octopart.com:443/138895710/technical_drawing/Alpha-%26-Omega-Semiconductor-AO3401A.pdf?src-supplier=Upverter, ComponentLink2URL=https://sigma.octopart.com:443/138895710/technical_drawing/Alpha-%26-Omega-Semiconductor-AO3401A.pdf?src-supplier=Upverter, ComponentLink3Description=https://sigma.octopart.com:443/140150677/technical_drawing/Alpha-%26-Omega-Semiconductor-AO3401A.pdf?src-supplier=Alpha+%26+Omega+Semiconductor+SCT, ComponentLink3URL=https://sigma.octopart.com:443/140150677/technical_drawing/Alpha-%26-Omega-Semiconductor-AO3401A.pdf?src-supplier=Alpha+%26+Omega+Semiconductor+SCT, ComponentLink4Description=https://datasheet.octopart.com:443/AO3401A-Alpha-%26-Omega-Semiconductor-datasheet-14060796.pdf?src-supplier=iiiC, ComponentLink4URL=https://datasheet.octopart.com:443/AO3401A-Alpha-%26-Omega-Semiconductor-datasheet-14060796.pdf?src-supplier=iiiC, Country of Origin="Mainland China", Drain to Source Voltage (Vdss)=-30V, Export Control Classification Number (ECCN) Code=EAR99, Height=1.25mm, Introduction Date=2007-04-10, Lead Free="Lead Free", Lifecycle Status=Production, Manufacturer Part Number=AO3401A, Max Operating Temperature=150°C, Mount="Surface Mount", Number of Channels=1, Number of Elements=1, Number of Pins=3, Number of Terminals=3, Power Dissipation=1.4W, Pricing 1="1=0.52, 10=0.322, 100=0.2043, 500=0.15316, 1000=0.13665 (USD)", Radiation Hardening=No, Rds On Max=44mΩ, REACH SVHC=Yes, RoHS=Compliant, Schedule B="8541290080, 8541290080|8541290080|8541290080|8541290080|8541290080", Stock 1=230075, Supplier 1=DigiKey, Turn-Off Delay Time=41ns, Turn-On Delay Time=6.5ns
R6 R7: library part RCA04021K00FKEDHP, "1kΩ SMD Chip Resistor, 1 kOhm, ± 1%, 200 mW, 0402 [1005 Metric], Thick Film, Anti-Sulfur High Power", Case/Package=0402, Manufacturer=Vishay, Max Operating Temperature=155°C, Min Operating Temperature=-55°C, Power Rating=200mW, Ratings=AEC-Q200, Resistance=1kΩ, Supplier Part Number 1=541-3240-1-ND, Temperature Coefficient=100ppm/°C, Tolerance=±1%, Working Voltage=50V, Category="Chip SMD Resistors", ComponentLink1Description=https://datasheet.octopart.com:443/RCA04021K00FKEDHP-Vishay-datasheet-182028367.pdf?src-supplier=IHS, ComponentLink1URL=https://datasheet.octopart.com:443/RCA04021K00FKEDHP-Vishay-datasheet-182028367.pdf?src-supplier=IHS, ComponentLink2Description=http://sigma.octopart.com:80/rohs_statement/Vishay-company-15.pdf?src-supplier=Compliance+Statements, ComponentLink2URL=http://sigma.octopart.com:80/rohs_statement/Vishay-company-15.pdf?src-supplier=Compliance+Statements, Country of Origin=Israel, Export Control Classification Number (ECCN) Code=EAR99, Harmonized Tariff Schedule (HTS) Code=8533.21.00.30, Height=300µm, Introduction Date=2016-09-25, Length=1mm, Lifecycle Status=Production, Manufacturer Part Number=RCA04021K00FKEDHP, Mount="Surface Mount", Number of Terminals=2, Pricing 1="1=0.1, 10=0.049, 25=0.0456, 50=0.043, 100=0.0407, 250=0.03772, 500=0.03566, 1000=0.03376, 5000=0.02999 (USD)", REACH SVHC=Yes, RoHS=Compliant, Stock 1=9610, Supplier 1=DigiKey, Width=500µm
R11 R16 R17 R20: library part RCS04020000Z0ED, "0Ω Resistor, Jumper, 0402 [1005 Metric], Thick Film, 200 mW, 3 A, Surface Mount Device", Case Code (Imperial)=0402, Case Code (Metric)=1005, Manufacturer=Vishay, Max Current Rating=3A, Max Operating Temperature=155°C, Max Power Dissipation=200mW, Min Operating Temperature=-55°C, Ratings=AEC-Q200, Resistance=0Ω, Supplier Part Number 1=541-2877-6-ND, Tolerance=±5%, Voltage Rating=50V, Case/Package=0402, Category="Chip SMD Resistors", China RoHS=Non-Compliant, ComponentLink1Description=https://datasheet.octopart.com:443/RCS04020000Z0ED-Vishay-datasheet-176436275.pdf?src-supplier=IHS, ComponentLink1URL=https://datasheet.octopart.com:443/RCS04020000Z0ED-Vishay-datasheet-176436275.pdf?src-supplier=IHS, ComponentLink2Description=https://datasheet.octopart.com:443/RCS04020000Z0ED-Vishay-datasheet-86813749.pdf?src-supplier=Future+Electronics, ComponentLink2URL=https://datasheet.octopart.com:443/RCS04020000Z0ED-Vishay-datasheet-86813749.pdf?src-supplier=Future+Electronics, ComponentLink3Description=http://sigma.octopart.com:80/rohs_statement/Vishay-company-15.pdf?src-supplier=Compliance+Statements, ComponentLink3URL=http://sigma.octopart.com:80/rohs_statement/Vishay-company-15.pdf?src-supplier=Compliance+Statements, Composition="Thick Film", Country of Origin="Israel, Mainland China", Export Control Classification Number (ECCN) Code=EAR99, Features="Automotive AEC-Q200", Harmonized Tariff Schedule (HTS) Code=8533.21.00.30, Height=350µm, Introduction Date=2016-07-12, Length=1mm, Lifecycle Status=Production, Manufacturer Part Number=RCS04020000Z0ED, Mount="Surface Mount", Number of Terminals=2, Number of Terminations=2, Power Rating=200mW, Pricing 1="1=0.1, 10=0.032, 25=0.0268, 50=0.0232, 100=0.0204, 250=0.01728, 500=0.01532, 1000=0.01364, 5000=0.01064 (USD)", REACH SVHC=Yes, RoHS=Compliant, Stock 1=775160, Supplier 1=DigiKey, Voltage Rating (DC)=50V, Width=500µm
R14 R18 R19: library part CRCW040210K0FKEDHP, "10kΩ Res Thick Film 0402 10K Ohm 1% 0.2W ±100ppm/°C Molded SMD SMD Paper T/R", Case Code (Imperial)=0402, Case Code (Metric)=1005, Manufacturer=Vishay, Manufacturer Package Identifier=CRCW0402-HPe3, Max Operating Temperature=155°C, Min Operating Temperature=-55°C, Power Rating=200mW, Ratings=AEC-Q200, Resistance=10kΩ, Supplier Part Number 1=541-10.0KYDKR-ND, Temperature Coefficient=100ppm/°C, Tolerance=±1%, Voltage Rating=50V, Case/Package=0402, Category="Chip SMD Resistors", China RoHS=Non-Compliant, ComponentLink1Description=https://datasheet.octopart.com/CRCW040210K0FKEDHP-Vishay-datasheet-83567917.pdf, ComponentLink1URL=https://datasheet.octopart.com/CRCW040210K0FKEDHP-Vishay-datasheet-83567917.pdf, ComponentLink2Description=https://datasheet.octopart.com:443/CRCW040210K0FKEDHP-Vishay-datasheet-13148866.pdf?src-supplier=Newark, ComponentLink2URL=https://datasheet.octopart.com:443/CRCW040210K0FKEDHP-Vishay-datasheet-13148866.pdf?src-supplier=Newark, ComponentLink3Description=https://datasheet.octopart.com:443/CRCW040210K0FKEDHP-Vishay-datasheet-13131392.pdf?src-supplier=Newark, ComponentLink3URL=https://datasheet.octopart.com:443/CRCW040210K0FKEDHP-Vishay-datasheet-13131392.pdf?src-supplier=Newark, ComponentLink4Description=https://datasheet.octopart.com:443/CRCW040210K0FKEDHP-Vishay-datasheet-12593106.pdf?src-supplier=Newark, ComponentLink4URL=https://datasheet.octopart.com:443/CRCW040210K0FKEDHP-Vishay-datasheet-12593106.pdf?src-supplier=Newark, ComponentLink5Description=https://datasheet.octopart.com:443/CRCW040210K0FKEDHP-Vishay-datasheet-12544674.pdf?src-supplier=Newark, ComponentLink5URL=https://datasheet.octopart.com:443/CRCW040210K0FKEDHP-Vishay-datasheet-12544674.pdf?src-supplier=Newark, ComponentLink6Description=https://datasheet.octopart.com:443/CRCW040210K0FKEDHP-Vishay-datasheet-12531795.pdf?src-supplier=Newark, ComponentLink6URL=https://datasheet.octopart.com:443/CRCW040210K0FKEDHP-Vishay-datasheet-12531795.pdf?src-supplier=Newark, ComponentLink7Description=https://datasheet.octopart.com:443/CRCW040210K0FKEDHP-Vishay-datasheet-12518686.pdf?src-supplier=Newark, ComponentLink7URL=https://datasheet.octopart.com:443/CRCW040210K0FKEDHP-Vishay-datasheet-12518686.pdf?src-supplier=Newark, ComponentLink8Description=https://datasheet.octopart.com:443/CRCW040210K0FKEDHP-Vishay-datasheet-12509906.pdf?src-supplier=Newark, ComponentLink8URL=https://datasheet.octopart.com:443/CRCW040210K0FKEDHP-Vishay-datasheet-12509906.pdf?src-supplier=Newark, ComponentLink9Description=https://datasheet.octopart.com:443/CRCW040210K0FKEDHP-Vishay-datasheet-10669844.pdf?src-supplier=Newark, ComponentLink9URL=https://datasheet.octopart.com:443/CRCW040210K0FKEDHP-Vishay-datasheet-10669844.pdf?src-supplier=Newark, ComponentLink10Description=https://datasheet.octopart.com:443/CRCW040210K0FKEDHP-Vishay-datasheet-8703221.pdf?src-supplier=Newark, ComponentLink10URL=https://datasheet.octopart.com:443/CRCW040210K0FKEDHP-Vishay-datasheet-8703221.pdf?src-supplier=Newark, ComponentLink11Description=https://datasheet.octopart.com:443/CRCW040210K0FKEDHP.-Vishay-datasheet-78776210.pdf?src-supplier=Newark, ComponentLink11URL=https://datasheet.octopart.com:443/CRCW040210K0FKEDHP.-Vishay-datasheet-78776210.pdf?src-supplier=Newark, ComponentLink12Description=https://datasheet.octopart.com:443/CRCW040210K0FKEDHP-Vishay-datasheet-21268118.pdf?src-supplier=Newark, ComponentLink12URL=https://datasheet.octopart.com:443/CRCW040210K0FKEDHP-Vishay-datasheet-21268118.pdf?src-supplier=Newark, ComponentLink13Description=https://datasheet.octopart.com:443/CRCW040210K0FKEDHP-Vishay-datasheet-21226360.pdf?src-supplier=Newark, ComponentLink13URL=https://datasheet.octopart.com:443/CRCW040210K0FKEDHP-Vishay-datasheet-21226360.pdf?src-supplier=Newark, ComponentLink14Description=https://datasheet.octopart.com:443/CRCW040210K0FKEDHP-Vishay-Draloric-datasheet-8359436.pdf?src-supplier=Newark, ComponentLink14URL=https://datasheet.octopart.com:443/CRCW040210K0FKEDHP-Vishay-Draloric-datasheet-8359436.pdf?src-supplier=Newark, ComponentLink15Description=https://datasheet.octopart.com:443/CRCW040210K0FKEDHP-Vishay-datasheet-87136057.pdf?src-supplier=Farnell, ComponentLink15URL=https://datasheet.octopart.com:443/CRCW040210K0FKEDHP-Vishay-datasheet-87136057.pdf?src-supplier=Farnell, ComponentLink16Description=https://datasheet.octopart.com:443/CRCW040210K0FKEDHP-Vishay-datasheet-37143532.pdf?src-supplier=Farnell, ComponentLink16URL=https://datasheet.octopart.com:443/CRCW040210K0FKEDHP-Vishay-datasheet-37143532.pdf?src-supplier=Farnell, ComponentLink17Description=https://datasheet.octopart.com:443/CRCW040210K0FKEDHP-Vishay-datasheet-41195455.pdf?src-supplier=Farnell, ComponentLink17URL=https://datasheet.octopart.com:443/CRCW040210K0FKEDHP-Vishay-datasheet-41195455.pdf?src-supplier=Farnell, ComponentLink18Description=https://datasheet.octopart.com:443/CRCW040210K0FKEDHP.-Vishay-datasheet-66581887.pdf?src-supplier=Farnell, ComponentLink18URL=https://datasheet.octopart.com:443/CRCW040210K0FKEDHP.-Vishay-datasheet-66581887.pdf?src-supplier=Farnell, ComponentLink19Description=https://datasheet.octopart.com:443/CRCW040210K0FKEDHP-Vishay-datasheet-62317933.pdf?src-supplier=element14+APAC, ComponentLink19URL=https://datasheet.octopart.com:443/CRCW040210K0FKEDHP-Vishay-datasheet-62317933.pdf?src-supplier=element14+APAC, ComponentLink20Description=https://datasheet.octopart.com:443/CRCW040210K0FKEDHP-Vishay-Dale-datasheet-41169523.pdf?src-supplier=element14+APAC, ComponentLink20URL=https://datasheet.octopart.com:443/CRCW040210K0FKEDHP-Vishay-Dale-datasheet-41169523.pdf?src-supplier=element14+APAC, ComponentLink21Description=https://datasheet.octopart.com:443/CRCW040210K0FKEDHP-Vishay-datasheet-192322387.pdf?src-supplier=HQonline, ComponentLink21URL=https://datasheet.octopart.com:443/CRCW040210K0FKEDHP-Vishay-datasheet-192322387.pdf?src-supplier=HQonline, ComponentLink22Description=https://datasheet.octopart.com:443/CRCW040210K0FKEDHP-Vishay-datasheet-62316122.pdf?src-supplier=Future+Electronics, ComponentLink22URL=https://datasheet.octopart.com:443/CRCW040210K0FKEDHP-Vishay-datasheet-62316122.pdf?src-supplier=Future+Electronics, ComponentLink23Description=https://datasheet.octopart.com:443/CRCW040210K0FKEDHP-Vishay-Dale-datasheet-47688881.pdf?src-supplier=RS+(Formerly+Allied+Electronics), ComponentLink23URL=https://datasheet.octopart.com:443/CRCW040210K0FKEDHP-Vishay-Dale-datasheet-47688881.pdf?src-supplier=RS+(Formerly+Allied+Electronics), ComponentLink24Description=https://datasheet.octopart.com:443/CRCW040210K0FKEDHP-Vishay-datasheet-11548710.pdf?src-supplier=Arrow+Electronics, ComponentLink24URL=https://datasheet.octopart.com:443/CRCW040210K0FKEDHP-Vishay-datasheet-11548710.pdf?src-supplier=Arrow+Electronics, ComponentLink25Description=http://sigma.octopart.com:80/rohs_statement/Vishay-company-15.pdf?src-supplier=Compliance+Statements, ComponentLink25URL=http://sigma.octopart.com:80/rohs_statement/Vishay-company-15.pdf?src-supplier=Compliance+Statements, Composition="Thick Film", Contact Plating=Tin, Country of Origin="Israel, Mainland China", Depth=500µm, Export Control Classification Number (ECCN) Code=EAR99, Harmonized Tariff Schedule (HTS) Code=8533.21.00.30, Height=300µm, Introduction Date=2008-07-29, Lead Free="Lead Free", Length=1mm, Lifecycle Status=Production, Manufacturer Part Number=CRCW040210K0FKEDHP, Military Standard=Not, Mount="Surface Mount", Number of Pins=2, Number of Terminals=2, Packaging="Cut Tape", Pricing 1="1=0.12, 10=0.057, 25=0.0436, 50=0.0362, 100=0.0303, 250=0.02452, 500=0.02122, 1000=0.0186, 5000=0.01445 (USD)", Radiation Hardening=No, REACH SVHC=Yes, RoHS=Compliant, Schedule B=8533210045, Stock 1=168325, Supplier 1=DigiKey, Termination=SMD/SMT, Voltage Rating (DC)=50V, Weight=652.039032µg, Width=500µm, Working Voltage=50V
R15: library part RCS0402300RFKED, "300Ω RCS e3 0402 0402 (1005Metric) Chip Resistor ±1% ±100ppm/C 300Ohms 0.2W 1/5W", Case/Package=0402, Manufacturer=Vishay, Max Operating Temperature=155°C, Max Power Dissipation=200mW, Min Operating Temperature=-55°C, Ratings=AEC-Q200, Resistance=300Ω, Temperature Coefficient=100ppm/°C, Tolerance=±1%, Working Voltage=50V, Category="Chip SMD Resistors", China RoHS=Non-Compliant, ComponentLink1Description=https://datasheet.octopart.com:443/RCS0402300RFKED-Vishay-datasheet-176436275.pdf?src-supplier=IHS, ComponentLink1URL=https://datasheet.octopart.com:443/RCS0402300RFKED-Vishay-datasheet-176436275.pdf?src-supplier=IHS, ComponentLink2Description=http://sigma.octopart.com:80/rohs_statement/Vishay-company-15.pdf?src-supplier=Compliance+Statements, ComponentLink2URL=http://sigma.octopart.com:80/rohs_statement/Vishay-company-15.pdf?src-supplier=Compliance+Statements, Composition="Thick Film", Country of Origin="Israel, Mainland China", Export Control Classification Number (ECCN) Code=EAR99, Features="Automotive AEC-Q200", Harmonized Tariff Schedule (HTS) Code=8533.21.00.30, Height=350µm, Introduction Date=2016-07-12, Length=1mm, Lifecycle Status=Production, Manufacturer Part Number=RCS0402300RFKED, Mount="Surface Mount", Number of Terminals=2, Number of Terminations=2, Power Rating=200mW, Pricing 1="1=0.13, 10=0.06, 25=0.0464, 50=0.0386, 100=0.0325, 250=0.0264, 500=0.02292, 1000=0.02015, 5000=0.01575 (USD)", REACH SVHC=Yes, RoHS=Compliant, Stock 1=8281, Supplier 1=DigiKey, Width=500µm